# Altium PCB SamirAbiNahed-DigitalTasbeeh.PcbDoc (part 1 of 2)
Units mm, origin at the board's own origin, x right, y up, seen from the top; angles counter-clockwise.
Board outline 32 x 12.5 mm, 2 copper layers (Top Layer, Bottom Layer), stack 0.37 mm thick; 38 components, 34 nets, 117 pads, 35 vias.
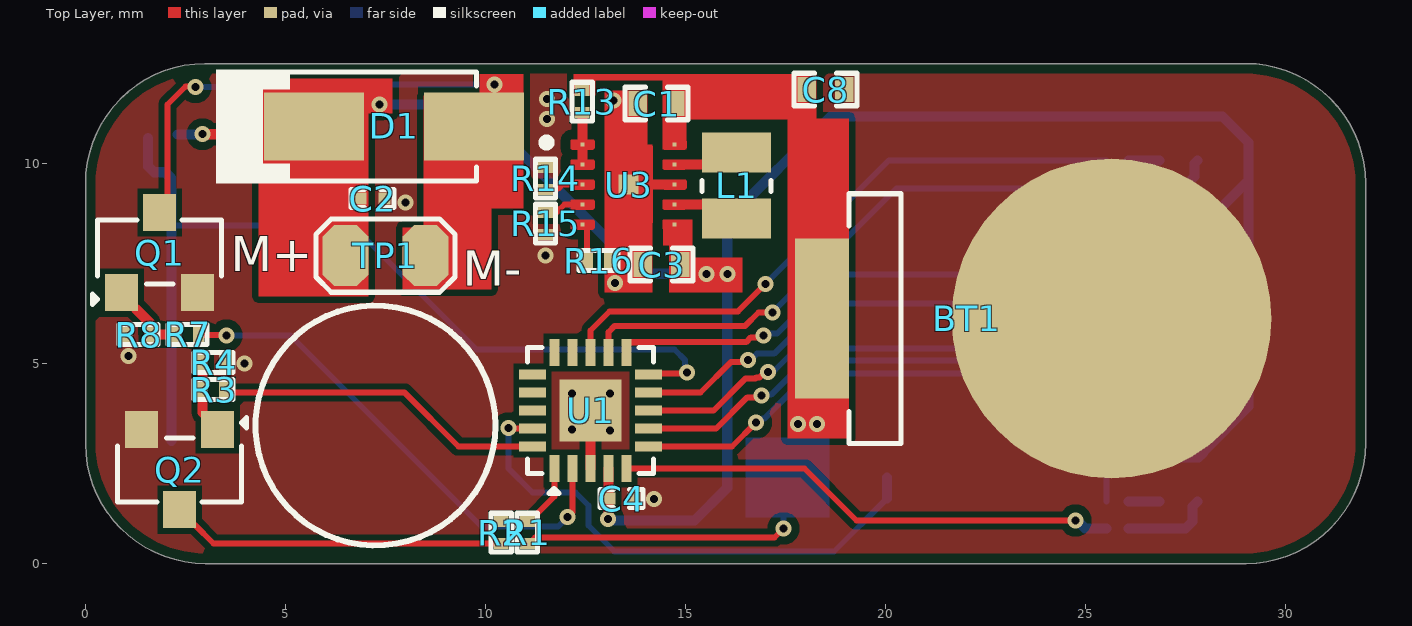
[diagram p0: Top Layer view]
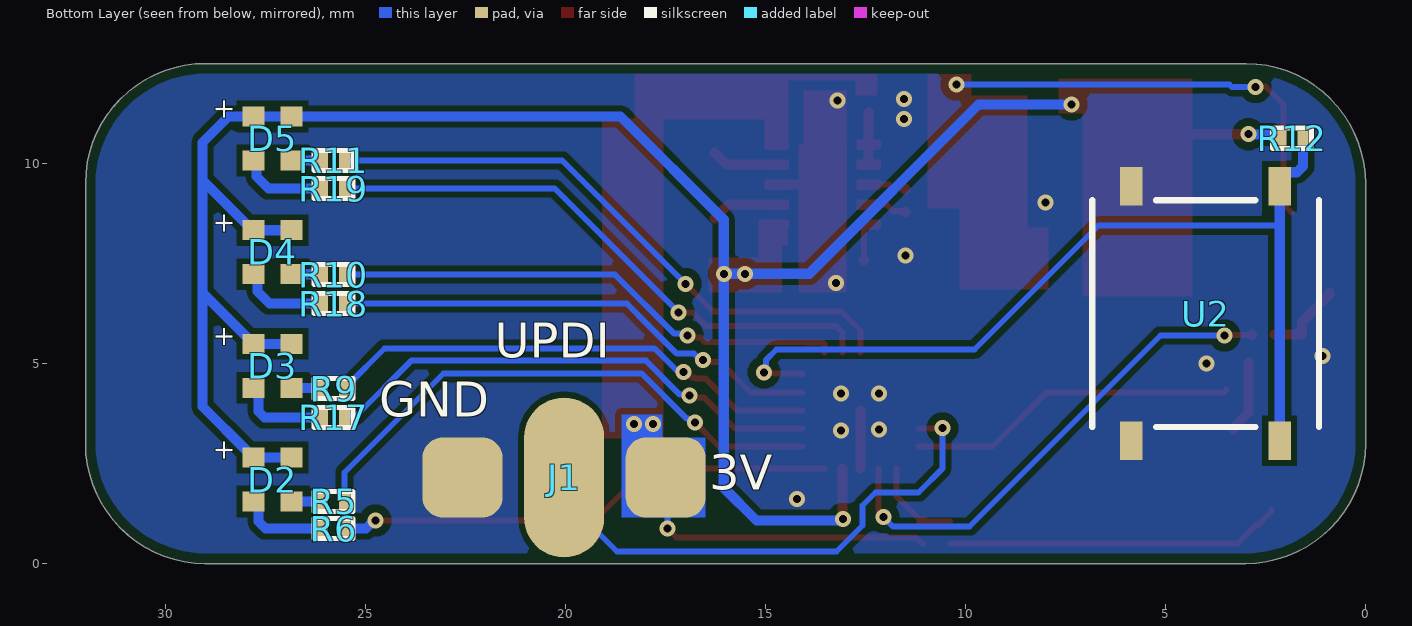
[diagram p1: Bottom Layer view, seen from below]
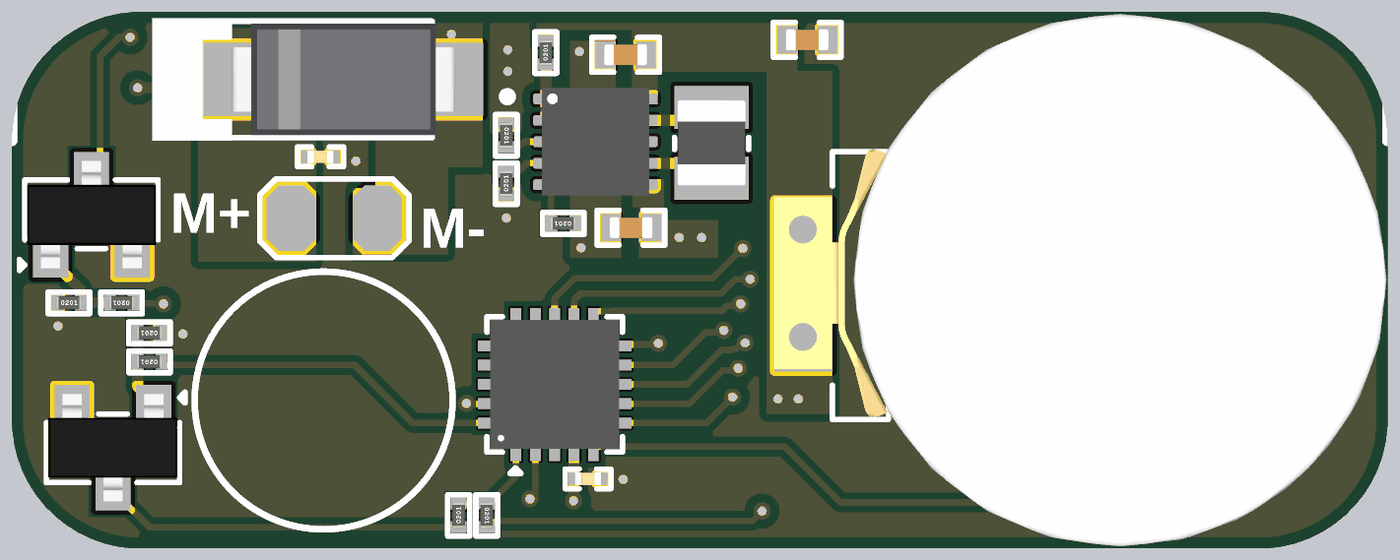
[diagram p2: 3D render of the assembled board from above, using the file's embedded part models]
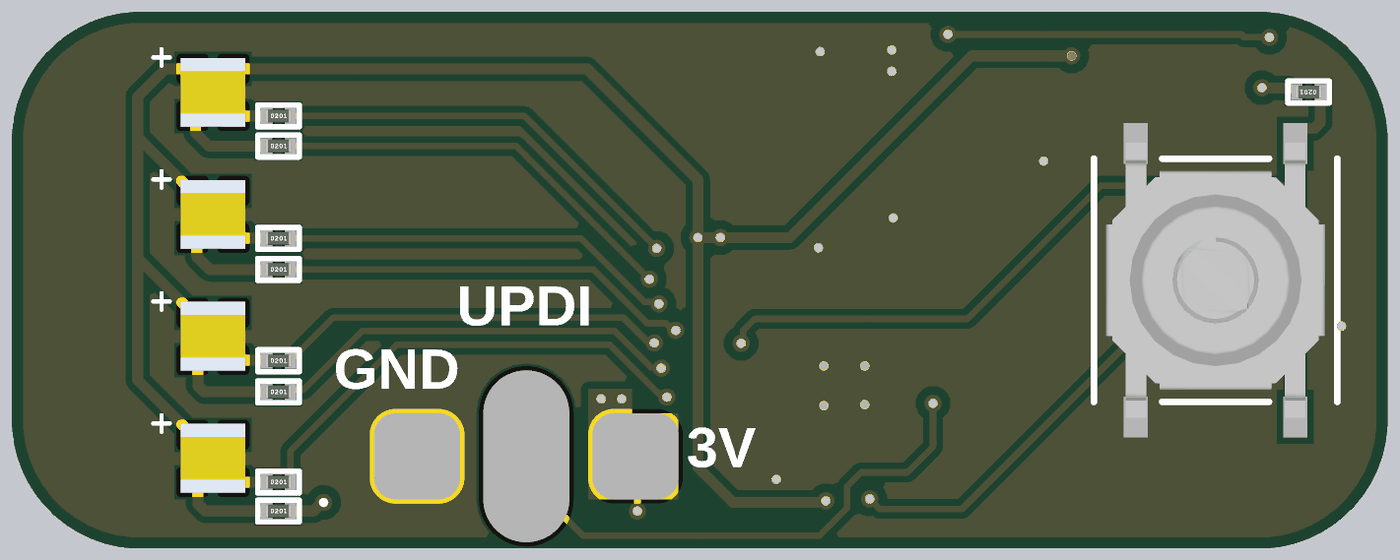
[diagram p3: 3D render of the assembled board from below, using the file's embedded part models]

## Layer stack, top to bottom
Top Solder: solder mask 0.01, Solder Resist, Dk 3.5
Top Layer: signal copper 0.035
Dielectric 1: dielectric 0.3, FR-4, Dk 4.8
Bottom Layer: signal copper 0.035
Bottom Solder: solder mask 0.01, Solder Resist, Dk 3.5

## Board outline
0,2.987 0,9.5 cw(c3,9.5) 2.987,12.5 29,12.5 cw(c29,9.5) 32,9.513 32,3 cw(c29,3) 29.013,0 3,0 cw(c3,3)

## Design rules (kind name [scope] priority, off if disabled: settings)
BoardOutlineClearance [All] p1: gap=0 ignorepadtopadclearanceinfootprint=FALSE except(0.254: Fill-OutlineEdge Poly-OutlineEdge)
Clearance [All] p1: gap=0.254 ignorepadtopadclearanceinfootprint=FALSE except(0: Arc-Hole Track-Hole SMDPad-Hole THPad-Hole Via-Hole Fill-Hole Poly-Hole Region-Hole Text-Hole; 0.127: Arc-SMDPad Arc-Text Track-SMDPad SMDPad-SMDPad SMDPad-Fill Fill-Fill Text-Text; 0.152: Arc-Arc Arc-Track Arc-Poly Track-Track Track-Poly SMDPad-Poly Fill-Poly Poly-Poly; 0.178: Arc-Via Arc-Region Track-Via Track-Fill Track-Region SMDPad-Via SMDPad-Region THPad-Via THPad-Poly Via-Via Via-Fill Fill-Region Region-Region; 0.203: Via-Poly)
MinimumSolderMaskSliver [All] p1: minsoldermaskwidth=0.025
PlaneConnect [All] p1: planeconnectstyle=Direct reliefexpansion=0.508 reliefentries=4 reliefconductorwidth=0.254 reliefairgap=0.254
PolygonConnect [All] p1: connectstyle=Direct reliefconductorwidth=0.254 reliefentries=4 polygonreliefangle="90 Angle" airgapwidth=0.254
RoutingVias [All] p1: holewidth=0.2 width=0.4 viastyle="Through Hole" minholewidth=0.2 minwidth=0.4 maxholewidth=0.2 maxwidth=0.4
SilkToSilkClearance [All] p1: silktosilkclearance=0
SilkToSolderMaskClearance [IsPad] p1: minsilkscreentomaskgap=0.003 clearancetoexposedcopper=TRUE
SolderMaskExpansion [All] p1: expansion=0.102 istentingtop=FALSE
SupplyNets "Schematic Supply Nets" [InNet('GND')] p1: voltage=0.000
Width [All] p1: maxlimit=0.762 minlimit=0.127 preferedwidth=0.254 minimp=50.000000 maximp=50.000000 favimp=50.000000
26 further rules are at their usual default settings.

## Classes and differential pairs
component class Power: BT1 C1 C3 C8 L1 R13 R14 R15 R16 U3
component class MCU: C2 C4 D1 D2 D3 D4 D5 J1 Q1 Q2 R1 R2 R3 R4 R5 R6 R7 R8 R9 R10 R11 R12 R17 R18 R19 TP1 U1 U2

## Components (designator, comment, footprint, x,y, rotation, side; value= is the part's Value field where it differs from the comment)
BT1 "120TR" BAT_120TR 18.411,6.125 r180 top
C1 "10uF" Cap-0402 14.275,11.5 r0 top
C2 "100nF" Cap-0201 7.177,9.125 r180 top
C3 "10uF" Cap-0402 14.4,7.475 r0 top
C4 "100nF" Cap-0201 13.4,1.625 r0 top
C8 "22uF" Cap-0402 18.5,11.85 r180 top
D1 "SS24A" SMA 7.713,10.926 r0 top
D2 "A-SP1942S1W1D-C01-2T" A-SP1942S1W1D-C01-2T 27.8,1.55 r90 bottom
D3 "A-SP1942S1W1D-C01-2T" A-SP1942S1W1D-C01-2T 27.8,4.392 r90 bottom
D4 "A-SP1942S1W1D-C01-2T" A-SP1942S1W1D-C01-2T 27.8,7.233 r90 bottom
D5 "A-SP1942S1W1D-C01-2T" A-SP1942S1W1D-C01-2T 27.8,10.075 r90 bottom
J1 "Test Pad SMD 3 Pin" "Test Pad (SMD 3 Pin)" 20.035,2.15 r270 bottom
L1 "2.2uH" IND-0806 16.275,9.45 r270 top
Q1 "SI2302-TP" SOT-23 1.85,7.775 r0 top
Q2 "SI2302-TP" SOT-23 2.35,2.35 r180 top
R1 "1M" Res-0201 11.046,0.775 r270 top value=1MR
R2 "1M" Res-0201 10.392,0.775 r90 top value=1MR
R3 "100R" Res-0201 3.2,4.35 r180 top
R4 "100K" Res-0201 3.2,5.025 r180 top
R5 "100R" Res-0201 25.8,1.55 r180 bottom
R6 "200R" Res-0201 25.8,0.875 r180 bottom
R7 "100R" Res-0201 2.55,5.725 r180 top
R8 "100K" Res-0201 1.325,5.725 r0 top
R9 "100R" Res-0201 25.8,4.375 r180 bottom
R10 "100R" Res-0201 25.8,7.225 r180 bottom
R11 "100R" Res-0201 25.8,10.075 r180 bottom
R12 "10K" Res-0201 1.837,10.634 r0 bottom
R13 "1M" Res-0201 12.417,11.55 r90 top
R14 "20.5k" Res-0201 11.5,9.625 r270 top
R15 "0R" Res-0201 11.5,8.5 r90 top
R16 "13.3k" Res-0201 12.825,7.575 r180 top
R17 "200R" Res-0201 25.8,3.65 r180 bottom
R18 "200R" Res-0201 25.8,6.5 r180 bottom
R19 "200R" Res-0201 25.8,9.375 r180 bottom
TP1 "LCM0720A3134F" "2 Test Pad" 8.498,7.697 r180 top
U1 "ATTINY1616-MNR" VQFN-20-EP(3x3) 12.625,3.825 r90 top
U2 "GT-TC084A-H015-L5" SMT_FS 4,6.25 r90 bottom
U3 "TPS63900DSKR" IC_TPS63900DSKR 13.575,9.475 r0 top

## Footprints (in the part's own frame and the unit in brackets; to place one, negate y for a bottom-side part, rotate by r counter-clockwise, add the part's x,y. Pads: shape width x height; smd on the part's side, far side on the other; paste and mask are expansions set on the pad)
"2 Test Pad" [mil]
  oct 45x60 smd: 1(0,0) 2(78.74,0)
  silkscreen extent -29,-36 108,36
A-SP1942S1W1D-C01-2T [mm]
  rect 0.5x0.55 smd: 1(0,-0.95) 2(0,0) 3(1.1,0) 4(1.1,-0.95)
  body extent -0.25,-1.22 1.35,0.28, height 0.4
BAT_120TR [mm]
  round 8 smd: N(-7.239,0)
  rect 1.35x4 smd: P(0,0)
  silkscreen extent -1.97,-3.12 -0.67,3.12, body extent -13.57,-6.33 0.69,6.07, height 2.5
Cap-0201 [mm]
  rect 0.3x0.3 smd mask+0.055: 1(-0.3,0) 2(0.3,0)
  silkscreen extent -0.53,-0.23 0.53,0.23, body extent -0.3,-0.15 0.3,0.15, height 0.28
Cap-0402 [mil]
  rect 18x25 smd mask+2.36: 1(-18.5,0) 2(18.5,0)
  silkscreen extent -31,-16 31,16, body extent -20,-10 20,10, height 19
IC_TPS63900DSKR [mm]
  rect 0.1x0.1 smd paste-1 mask+0: 1(-1.15,1) 2(-1.15,0.5) 3(-1.15,0) 4(-1.15,-0.5) 5(-1.15,-1) 6(1.15,-1) 7(1.15,-0.5) 8(1.15,0) 9(1.15,0.5) 10(1.15,1)
  rect 0.5x0.5 smd paste-1 mask+0: 11(0,0)
  Top Layer region: -0.892,0.124 -0.89,0.124 -0.887,0.123 -0.885,0.123 -0.882,0.122 -0.88,0.121 -0.877,0.12 -0.875,0.118 -0.873,0.117 -0.871,0.115 -0.869,0.114 -0.867,0.112 -0.865,0.11 -0.863,0.108 -0.861,0.106 -0.86,0.104 -0.858,0.102 -0.857,0.1 -0.855,0.098 -0.854,0.095 -0.853,0.093 -0.852,0.09 -0.852,0.088 -0.851,0.085 -0.851,0.083 -0.85,0.08 -0.85,0.078 -0.85,0.075 -0.85,-0.075 -0.85,-0.078 -0.85,-0.08 -0.851,-0.083 -0.851,-0.085 -0.852,-0.088 -0.852,-0.09 -0.853,-0.093 -0.854,-0.095 -0.855,-0.098 -0.857,-0.1 -0.858,-0.102 -0.86,-0.104 -0.861,-0.106 -0.863,-0.108 -0.865,-0.11 -0.867,-0.112 -0.869,-0.114 -0.871,-0.115 -0.873,-0.117 -0.875,-0.118 -0.877,-0.12 -0.88,-0.121 -0.882,-0.122 -0.885,-0.123 -0.887,-0.123 -0.89,-0.124 -0.892,-0.124 -0.895,-0.125 -1.405,-0.125 -1.408,-0.124 -1.41,-0.124 -1.413,-0.123 -1.415,-0.123 -1.418,-0.122 -1.42,-0.121 -1.423,-0.12 -1.425,-0.118 -1.427,-0.117 -1.429,-0.115 -1.431,-0.114 -1.433,-0.112 -1.435,-0.11 -1.437,-0.108 -1.439,-0.106 -1.44,-0.104 -1.442,-0.102 -1.443,-0.1 -1.445,-0.098 -1.446,-0.095 -1.447,-0.093 -1.448,-0.09 -1.448,-0.088 -1.449,-0.085 -1.449,-0.083 -1.45,-0.08 -1.45,-0.078 -1.45,-0.075 -1.45,0.075 -1.45,0.078 -1.45,0.08 -1.449,0.083 -1.449,0.085 -1.448,0.088 -1.448,0.09 -1.447,0.093 -1.446,0.095 -1.445,0.098 -1.443,0.1 -1.442,0.102 -1.44,0.104 -1.439,0.106 -1.437,0.108 -1.435,0.11 -1.433,0.112 -1.431,0.114 -1.429,0.115 -1.427,0.117 -1.425,0.118 -1.423,0.12 -1.42,0.121 -1.418,0.122 -1.415,0.123 -1.413,0.123 -1.41,0.124 -1.408,0.124 -1.405,0.125 -0.895,0.125
  Top Layer region: -0.892,0.624 -0.89,0.624 -0.887,0.623 -0.885,0.623 -0.882,0.622 -0.88,0.621 -0.877,0.62 -0.875,0.618 -0.873,0.617 -0.871,0.615 -0.869,0.614 -0.867,0.612 -0.865,0.61 -0.863,0.608 -0.861,0.606 -0.86,0.604 -0.858,0.602 -0.857,0.6 -0.855,0.598 -0.854,0.595 -0.853,0.593 -0.852,0.59 -0.852,0.588 -0.851,0.585 -0.851,0.583 -0.85,0.58 -0.85,0.578 -0.85,0.575 -0.85,0.425 -0.85,0.422 -0.85,0.42 -0.851,0.417 -0.851,0.415 -0.852,0.412 -0.852,0.41 -0.853,0.407 -0.854,0.405 -0.855,0.402 -0.857,0.4 -0.858,0.398 -0.86,0.396 -0.861,0.394 -0.863,0.392 -0.865,0.39 -0.867,0.388 -0.869,0.386 -0.871,0.385 -0.873,0.383 -0.875,0.382 -0.877,0.38 -0.88,0.379 -0.882,0.378 -0.885,0.377 -0.887,0.377 -0.89,0.376 -0.892,0.376 -0.895,0.375 -1.405,0.375 -1.408,0.376 -1.41,0.376 -1.413,0.377 -1.415,0.377 -1.418,0.378 -1.42,0.379 -1.423,0.38 -1.425,0.382 -1.427,0.383 -1.429,0.385 -1.431,0.386 -1.433,0.388 -1.435,0.39 -1.437,0.392 -1.439,0.394 -1.44,0.396 -1.442,0.398 -1.443,0.4 -1.445,0.402 -1.446,0.405 -1.447,0.407 -1.448,0.41 -1.448,0.412 -1.449,0.415 -1.449,0.417 -1.45,0.42 -1.45,0.422 -1.45,0.425 -1.45,0.575 -1.45,0.578 -1.45,0.58 -1.449,0.583 -1.449,0.585 -1.448,0.588 -1.448,0.59 -1.447,0.593 -1.446,0.595 -1.445,0.598 -1.443,0.6 -1.442,0.602 -1.44,0.604 -1.439,0.606 -1.437,0.608 -1.435,0.61 -1.433,0.612 -1.431,0.614 -1.429,0.615 -1.427,0.617 -1.425,0.618 -1.423,0.62 -1.42,0.621 -1.418,0.622 -1.415,0.623 -1.413,0.623 -1.41,0.624 -1.408,0.624 -1.405,0.625 -0.895,0.625
  Top Layer region: -0.892,1.124 -0.89,1.124 -0.887,1.123 -0.885,1.123 -0.882,1.122 -0.88,1.121 -0.877,1.12 -0.875,1.118 -0.873,1.117 -0.871,1.115 -0.869,1.114 -0.867,1.112 -0.865,1.11 -0.863,1.108 -0.861,1.106 -0.86,1.104 -0.858,1.102 -0.857,1.1 -0.855,1.098 -0.854,1.095 -0.853,1.093 -0.852,1.09 -0.852,1.088 -0.851,1.085 -0.851,1.083 -0.85,1.08 -0.85,1.078 -0.85,1.075 -0.85,0.925 -0.85,0.922 -0.85,0.92 -0.851,0.917 -0.851,0.915 -0.852,0.912 -0.852,0.91 -0.853,0.907 -0.854,0.905 -0.855,0.902 -0.857,0.9 -0.858,0.898 -0.86,0.896 -0.861,0.894 -0.863,0.892 -0.865,0.89 -0.867,0.888 -0.869,0.886 -0.871,0.885 -0.873,0.883 -0.875,0.882 -0.877,0.88 -0.88,0.879 -0.882,0.878 -0.885,0.877 -0.887,0.877 -0.89,0.876 -0.892,0.876 -0.895,0.875 -1.405,0.875 -1.408,0.876 -1.41,0.876 -1.413,0.877 -1.415,0.877 -1.418,0.878 -1.42,0.879 -1.423,0.88 -1.425,0.882 -1.427,0.883 -1.429,0.885 -1.431,0.886 -1.433,0.888 -1.435,0.89 -1.437,0.892 -1.439,0.894 -1.44,0.896 -1.442,0.898 -1.443,0.9 -1.445,0.902 -1.446,0.905 -1.447,0.907 -1.448,0.91 -1.448,0.912 -1.449,0.915 -1.449,0.917 -1.45,0.92 -1.45,0.922 -1.45,0.925 -1.45,1.075 -1.45,1.078 -1.45,1.08 -1.449,1.083 -1.449,1.085 -1.448,1.088 -1.448,1.09 -1.447,1.093 -1.446,1.095 -1.445,1.098 -1.443,1.1 -1.442,1.102 -1.44,1.104 -1.439,1.106 -1.437,1.108 -1.435,1.11 -1.433,1.112 -1.431,1.114 -1.429,1.115 -1.427,1.117 -1.425,1.118 -1.423,1.12 -1.42,1.121 -1.418,1.122 -1.415,1.123 -1.413,1.123 -1.41,1.124 -1.408,1.124 -1.405,1.125 -0.895,1.125
  Top Layer region: -0.892,-0.376 -0.89,-0.376 -0.887,-0.377 -0.885,-0.377 -0.882,-0.378 -0.88,-0.379 -0.877,-0.38 -0.875,-0.382 -0.873,-0.383 -0.871,-0.385 -0.869,-0.386 -0.867,-0.388 -0.865,-0.39 -0.863,-0.392 -0.861,-0.394 -0.86,-0.396 -0.858,-0.398 -0.857,-0.4 -0.855,-0.402 -0.854,-0.405 -0.853,-0.407 -0.852,-0.41 -0.852,-0.412 -0.851,-0.415 -0.851,-0.417 -0.85,-0.42 -0.85,-0.422 -0.85,-0.425 -0.85,-0.575 -0.85,-0.578 -0.85,-0.58 -0.851,-0.583 -0.851,-0.585 -0.852,-0.588 -0.852,-0.59 -0.853,-0.593 -0.854,-0.595 -0.855,-0.598 -0.857,-0.6 -0.858,-0.602 -0.86,-0.604 -0.861,-0.606 -0.863,-0.608 -0.865,-0.61 -0.867,-0.612 -0.869,-0.614 -0.871,-0.615 -0.873,-0.617 -0.875,-0.618 -0.877,-0.62 -0.88,-0.621 -0.882,-0.622 -0.885,-0.623 -0.887,-0.623 -0.89,-0.624 -0.892,-0.624 -0.895,-0.625 -1.405,-0.625 -1.408,-0.624 -1.41,-0.624 -1.413,-0.623 -1.415,-0.623 -1.418,-0.622 -1.42,-0.621 -1.423,-0.62 -1.425,-0.618 -1.427,-0.617 -1.429,-0.615 -1.431,-0.614 -1.433,-0.612 -1.435,-0.61 -1.437,-0.608 -1.439,-0.606 -1.44,-0.604 -1.442,-0.602 -1.443,-0.6 -1.445,-0.598 -1.446,-0.595 -1.447,-0.593 -1.448,-0.59 -1.448,-0.588 -1.449,-0.585 -1.449,-0.583 -1.45,-0.58 -1.45,-0.578 -1.45,-0.575 -1.45,-0.425 -1.45,-0.422 -1.45,-0.42 -1.449,-0.417 -1.449,-0.415 -1.448,-0.412 -1.448,-0.41 -1.447,-0.407 -1.446,-0.405 -1.445,-0.402 -1.443,-0.4 -1.442,-0.398 -1.44,-0.396 -1.439,-0.394 -1.437,-0.392 -1.435,-0.39 -1.433,-0.388 -1.431,-0.386 -1.429,-0.385 -1.427,-0.383 -1.425,-0.382 -1.423,-0.38 -1.42,-0.379 -1.418,-0.378 -1.415,-0.377 -1.413,-0.377 -1.41,-0.376 -1.408,-0.376 -1.405,-0.375 -0.895,-0.375
  Top Layer region: -0.892,-0.876 -0.89,-0.876 -0.887,-0.877 -0.885,-0.877 -0.882,-0.878 -0.88,-0.879 -0.877,-0.88 -0.875,-0.882 -0.873,-0.883 -0.871,-0.885 -0.869,-0.886 -0.867,-0.888 -0.865,-0.89 -0.863,-0.892 -0.861,-0.894 -0.86,-0.896 -0.858,-0.898 -0.857,-0.9 -0.855,-0.902 -0.854,-0.905 -0.853,-0.907 -0.852,-0.91 -0.852,-0.912 -0.851,-0.915 -0.851,-0.917 -0.85,-0.92 -0.85,-0.922 -0.85,-0.925 -0.85,-1.075 -0.85,-1.078 -0.85,-1.08 -0.851,-1.083 -0.851,-1.085 -0.852,-1.088 -0.852,-1.09 -0.853,-1.093 -0.854,-1.095 -0.855,-1.098 -0.857,-1.1 -0.858,-1.102 -0.86,-1.104 -0.861,-1.106 -0.863,-1.108 -0.865,-1.11 -0.867,-1.112 -0.869,-1.114 -0.871,-1.115 -0.873,-1.117 -0.875,-1.118 -0.877,-1.12 -0.88,-1.121 -0.882,-1.122 -0.885,-1.123 -0.887,-1.123 -0.89,-1.124 -0.892,-1.124 -0.895,-1.125 -1.405,-1.125 -1.408,-1.124 -1.41,-1.124 -1.413,-1.123 -1.415,-1.123 -1.418,-1.122 -1.42,-1.121 -1.423,-1.12 -1.425,-1.118 -1.427,-1.117 -1.429,-1.115 -1.431,-1.114 -1.433,-1.112 -1.435,-1.11 -1.437,-1.108 -1.439,-1.106 -1.44,-1.104 -1.442,-1.102 -1.443,-1.1 -1.445,-1.098 -1.446,-1.095 -1.447,-1.093 -1.448,-1.09 -1.448,-1.088 -1.449,-1.085 -1.449,-1.083 -1.45,-1.08 -1.45,-1.078 -1.45,-1.075 -1.45,-0.925 -1.45,-0.922 -1.45,-0.92 -1.449,-0.917 -1.449,-0.915 -1.448,-0.912 -1.448,-0.91 -1.447,-0.907 -1.446,-0.905 -1.445,-0.902 -1.443,-0.9 -1.442,-0.898 -1.44,-0.896 -1.439,-0.894 -1.437,-0.892 -1.435,-0.89 -1.433,-0.888 -1.431,-0.886 -1.429,-0.885 -1.427,-0.883 -1.425,-0.882 -1.423,-0.88 -1.42,-0.879 -1.418,-0.878 -1.415,-0.877 -1.413,-0.877 -1.41,-0.876 -1.408,-0.876 -1.405,-0.875 -0.895,-0.875
  Top Layer region: 1.408,0.124 1.41,0.124 1.413,0.123 1.415,0.123 1.418,0.122 1.42,0.121 1.423,0.12 1.425,0.118 1.427,0.117 1.429,0.115 1.431,0.114 1.433,0.112 1.435,0.11 1.437,0.108 1.439,0.106 1.44,0.104 1.442,0.102 1.443,0.1 1.445,0.098 1.446,0.095 1.447,0.093 1.448,0.09 1.448,0.088 1.449,0.085 1.449,0.083 1.45,0.08 1.45,0.078 1.45,0.075 1.45,-0.075 1.45,-0.078 1.45,-0.08 1.449,-0.083 1.449,-0.085 1.448,-0.088 1.448,-0.09 1.447,-0.093 1.446,-0.095 1.445,-0.098 1.443,-0.1 1.442,-0.102 1.44,-0.104 1.439,-0.106 1.437,-0.108 1.435,-0.11 1.433,-0.112 1.431,-0.114 1.429,-0.115 1.427,-0.117 1.425,-0.118 1.423,-0.12 1.42,-0.121 1.418,-0.122 1.415,-0.123 1.413,-0.123 1.41,-0.124 1.408,-0.124 1.405,-0.125 0.895,-0.125 0.892,-0.124 0.89,-0.124 0.887,-0.123 0.885,-0.123 0.882,-0.122 0.88,-0.121 0.877,-0.12 0.875,-0.118 0.873,-0.117 0.871,-0.115 0.869,-0.114 0.867,-0.112 0.865,-0.11 0.863,-0.108 0.861,-0.106 0.86,-0.104 0.858,-0.102 0.857,-0.1 0.855,-0.098 0.854,-0.095 0.853,-0.093 0.852,-0.09 0.852,-0.088 0.851,-0.085 0.851,-0.083 0.85,-0.08 0.85,-0.078 0.85,-0.075 0.85,0.075 0.85,0.078 0.85,0.08 0.851,0.083 0.851,0.085 0.852,0.088 0.852,0.09 0.853,0.093 0.854,0.095 0.855,0.098 0.857,0.1 0.858,0.102 0.86,0.104 0.861,0.106 0.863,0.108 0.865,0.11 0.867,0.112 0.869,0.114 0.871,0.115 0.873,0.117 0.875,0.118 0.877,0.12 0.88,0.121 0.882,0.122 0.885,0.123 0.887,0.123 0.89,0.124 0.892,0.124 0.895,0.125 1.405,0.125
  Top Layer region: 1.408,0.624 1.41,0.624 1.413,0.623 1.415,0.623 1.418,0.622 1.42,0.621 1.423,0.62 1.425,0.618 1.427,0.617 1.429,0.615 1.431,0.614 1.433,0.612 1.435,0.61 1.437,0.608 1.439,0.606 1.44,0.604 1.442,0.602 1.443,0.6 1.445,0.598 1.446,0.595 1.447,0.593 1.448,0.59 1.448,0.588 1.449,0.585 1.449,0.583 1.45,0.58 1.45,0.578 1.45,0.575 1.45,0.425 1.45,0.422 1.45,0.42 1.449,0.417 1.449,0.415 1.448,0.412 1.448,0.41 1.447,0.407 1.446,0.405 1.445,0.402 1.443,0.4 1.442,0.398 1.44,0.396 1.439,0.394 1.437,0.392 1.435,0.39 1.433,0.388 1.431,0.386 1.429,0.385 1.427,0.383 1.425,0.382 1.423,0.38 1.42,0.379 1.418,0.378 1.415,0.377 1.413,0.377 1.41,0.376 1.408,0.376 1.405,0.375 0.895,0.375 0.892,0.376 0.89,0.376 0.887,0.377 0.885,0.377 0.882,0.378 0.88,0.379 0.877,0.38 0.875,0.382 0.873,0.383 0.871,0.385 0.869,0.386 0.867,0.388 0.865,0.39 0.863,0.392 0.861,0.394 0.86,0.396 0.858,0.398 0.857,0.4 0.855,0.402 0.854,0.405 0.853,0.407 0.852,0.41 0.852,0.412 0.851,0.415 0.851,0.417 0.85,0.42 0.85,0.422 0.85,0.425 0.85,0.575 0.85,0.578 0.85,0.58 0.851,0.583 0.851,0.585 0.852,0.588 0.852,0.59 0.853,0.593 0.854,0.595 0.855,0.598 0.857,0.6 0.858,0.602 0.86,0.604 0.861,0.606 0.863,0.608 0.865,0.61 0.867,0.612 0.869,0.614 0.871,0.615 0.873,0.617 0.875,0.618 0.877,0.62 0.88,0.621 0.882,0.622 0.885,0.623 0.887,0.623 0.89,0.624 0.892,0.624 0.895,0.625 1.405,0.625
  Top Layer region: 1.408,1.124 1.41,1.124 1.413,1.123 1.415,1.123 1.418,1.122 1.42,1.121 1.423,1.12 1.425,1.118 1.427,1.117 1.429,1.115 1.431,1.114 1.433,1.112 1.435,1.11 1.437,1.108 1.439,1.106 1.44,1.104 1.442,1.102 1.443,1.1 1.445,1.098 1.446,1.095 1.447,1.093 1.448,1.09 1.448,1.088 1.449,1.085 1.449,1.083 1.45,1.08 1.45,1.078 1.45,1.075 1.45,0.925 1.45,0.922 1.45,0.92 1.449,0.917 1.449,0.915 1.448,0.912 1.448,0.91 1.447,0.907 1.446,0.905 1.445,0.902 1.443,0.9 1.442,0.898 1.44,0.896 1.439,0.894 1.437,0.892 1.435,0.89 1.433,0.888 1.431,0.886 1.429,0.885 1.427,0.883 1.425,0.882 1.423,0.88 1.42,0.879 1.418,0.878 1.415,0.877 1.413,0.877 1.41,0.876 1.408,0.876 1.405,0.875 0.895,0.875 0.892,0.876 0.89,0.876 0.887,0.877 0.885,0.877 0.882,0.878 0.88,0.879 0.877,0.88 0.875,0.882 0.873,0.883 0.871,0.885 0.869,0.886 0.867,0.888 0.865,0.89 0.863,0.892 0.861,0.894 0.86,0.896 0.858,0.898 0.857,0.9 0.855,0.902 0.854,0.905 0.853,0.907 0.852,0.91 0.852,0.912 0.851,0.915 0.851,0.917 0.85,0.92 0.85,0.922 0.85,0.925 0.85,1.075 0.85,1.078 0.85,1.08 0.851,1.083 0.851,1.085 0.852,1.088 0.852,1.09 0.853,1.093 0.854,1.095 0.855,1.098 0.857,1.1 0.858,1.102 0.86,1.104 0.861,1.106 0.863,1.108 0.865,1.11 0.867,1.112 0.869,1.114 0.871,1.115 0.873,1.117 0.875,1.118 0.877,1.12 0.88,1.121 0.882,1.122 0.885,1.123 0.887,1.123 0.89,1.124 0.892,1.124 0.895,1.125 1.405,1.125
  Top Layer region: 1.408,-0.376 1.41,-0.376 1.413,-0.377 1.415,-0.377 1.418,-0.378 1.42,-0.379 1.423,-0.38 1.425,-0.382 1.427,-0.383 1.429,-0.385 1.431,-0.386 1.433,-0.388 1.435,-0.39 1.437,-0.392 1.439,-0.394 1.44,-0.396 1.442,-0.398 1.443,-0.4 1.445,-0.402 1.446,-0.405 1.447,-0.407 1.448,-0.41 1.448,-0.412 1.449,-0.415 1.449,-0.417 1.45,-0.42 1.45,-0.422 1.45,-0.425 1.45,-0.575 1.45,-0.578 1.45,-0.58 1.449,-0.583 1.449,-0.585 1.448,-0.588 1.448,-0.59 1.447,-0.593 1.446,-0.595 1.445,-0.598 1.443,-0.6 1.442,-0.602 1.44,-0.604 1.439,-0.606 1.437,-0.608 1.435,-0.61 1.433,-0.612 1.431,-0.614 1.429,-0.615 1.427,-0.617 1.425,-0.618 1.423,-0.62 1.42,-0.621 1.418,-0.622 1.415,-0.623 1.413,-0.623 1.41,-0.624 1.408,-0.624 1.405,-0.625 0.895,-0.625 0.892,-0.624 0.89,-0.624 0.887,-0.623 0.885,-0.623 0.882,-0.622 0.88,-0.621 0.877,-0.62 0.875,-0.618 0.873,-0.617 0.871,-0.615 0.869,-0.614 0.867,-0.612 0.865,-0.61 0.863,-0.608 0.861,-0.606 0.86,-0.604 0.858,-0.602 0.857,-0.6 0.855,-0.598 0.854,-0.595 0.853,-0.593 0.852,-0.59 0.852,-0.588 0.851,-0.585 0.851,-0.583 0.85,-0.58 0.85,-0.578 0.85,-0.575 0.85,-0.425 0.85,-0.422 0.85,-0.42 0.851,-0.417 0.851,-0.415 0.852,-0.412 0.852,-0.41 0.853,-0.407 0.854,-0.405 0.855,-0.402 0.857,-0.4 0.858,-0.398 0.86,-0.396 0.861,-0.394 0.863,-0.392 0.865,-0.39 0.867,-0.388 0.869,-0.386 0.871,-0.385 0.873,-0.383 0.875,-0.382 0.877,-0.38 0.88,-0.379 0.882,-0.378 0.885,-0.377 0.887,-0.377 0.89,-0.376 0.892,-0.376 0.895,-0.375 1.405,-0.375
  Top Layer region: 1.408,-0.876 1.41,-0.876 1.413,-0.877 1.415,-0.877 1.418,-0.878 1.42,-0.879 1.423,-0.88 1.425,-0.882 1.427,-0.883 1.429,-0.885 1.431,-0.886 1.433,-0.888 1.435,-0.89 1.437,-0.892 1.439,-0.894 1.44,-0.896 1.442,-0.898 1.443,-0.9 1.445,-0.902 1.446,-0.905 1.447,-0.907 1.448,-0.91 1.448,-0.912 1.449,-0.915 1.449,-0.917 1.45,-0.92 1.45,-0.922 1.45,-0.925 1.45,-1.075 1.45,-1.078 1.45,-1.08 1.449,-1.083 1.449,-1.085 1.448,-1.088 1.448,-1.09 1.447,-1.093 1.446,-1.095 1.445,-1.098 1.443,-1.1 1.442,-1.102 1.44,-1.104 1.439,-1.106 1.437,-1.108 1.435,-1.11 1.433,-1.112 1.431,-1.114 1.429,-1.115 1.427,-1.117 1.425,-1.118 1.423,-1.12 1.42,-1.121 1.418,-1.122 1.415,-1.123 1.413,-1.123 1.41,-1.124 1.408,-1.124 1.405,-1.125 0.895,-1.125 0.892,-1.124 0.89,-1.124 0.887,-1.123 0.885,-1.123 0.882,-1.122 0.88,-1.121 0.877,-1.12 0.875,-1.118 0.873,-1.117 0.871,-1.115 0.869,-1.114 0.867,-1.112 0.865,-1.11 0.863,-1.108 0.861,-1.106 0.86,-1.104 0.858,-1.102 0.857,-1.1 0.855,-1.098 0.854,-1.095 0.853,-1.093 0.852,-1.09 0.852,-1.088 0.851,-1.085 0.851,-1.083 0.85,-1.08 0.85,-1.078 0.85,-1.075 0.85,-0.925 0.85,-0.922 0.85,-0.92 0.851,-0.917 0.851,-0.915 0.852,-0.912 0.852,-0.91 0.853,-0.907 0.854,-0.905 0.855,-0.902 0.857,-0.9 0.858,-0.898 0.86,-0.896 0.861,-0.894 0.863,-0.892 0.865,-0.89 0.867,-0.888 0.869,-0.886 0.871,-0.885 0.873,-0.883 0.875,-0.882 0.877,-0.88 0.88,-0.879 0.882,-0.878 0.885,-0.877 0.887,-0.877 0.89,-0.876 0.892,-0.876 0.895,-0.875 1.405,-0.875
  Top Layer region: 0.558,0.999 0.56,0.999 0.563,0.998 0.565,0.998 0.568,0.997 0.57,0.996 0.573,0.995 0.575,0.993 0.577,0.992 0.579,0.99 0.581,0.989 0.583,0.987 0.585,0.985 0.587,0.983 0.589,0.981 0.59,0.979 0.592,0.977 0.593,0.975 0.595,0.973 0.596,0.97 0.597,0.968 0.598,0.965 0.598,0.963 0.599,0.96 0.599,0.958 0.6,0.955 0.6,0.953 0.6,0.95 0.6,-0.95 0.6,-0.953 0.6,-0.955 0.599,-0.958 0.599,-0.96 0.598,-0.963 0.598,-0.965 0.597,-0.968 0.596,-0.97 0.595,-0.973 0.593,-0.975 0.592,-0.977 0.59,-0.979 0.589,-0.981 0.587,-0.983 0.585,-0.985 0.583,-0.987 0.581,-0.989 0.579,-0.99 0.577,-0.992 0.575,-0.993 0.573,-0.995 0.57,-0.996 0.568,-0.997 0.565,-0.998 0.563,-0.998 0.56,-0.999 0.558,-0.999 0.555,-1 -0.555,-1 -0.558,-0.999 -0.56,-0.999 -0.563,-0.998 -0.565,-0.998 -0.568,-0.997 -0.57,-0.996 -0.573,-0.995 -0.575,-0.993 -0.577,-0.992 -0.579,-0.99 -0.581,-0.989 -0.583,-0.987 -0.585,-0.985 -0.587,-0.983 -0.589,-0.981 -0.59,-0.979 -0.592,-0.977 -0.593,-0.975 -0.595,-0.973 -0.596,-0.97 -0.597,-0.968 -0.598,-0.965 -0.598,-0.963 -0.599,-0.96 -0.599,-0.958 -0.6,-0.955 -0.6,-0.953 -0.6,-0.95 -0.6,0.95 -0.6,0.953 -0.6,0.955 -0.599,0.958 -0.599,0.96 -0.598,0.963 -0.598,0.965 -0.597,0.968 -0.596,0.97 -0.595,0.973 -0.593,0.975 -0.592,0.977 -0.59,0.979 -0.589,0.981 -0.587,0.983 -0.585,0.985 -0.583,0.987 -0.581,0.989 -0.579,0.99 -0.577,0.992 -0.575,0.993 -0.573,0.995 -0.57,0.996 -0.568,0.997 -0.565,0.998 -0.563,0.998 -0.56,0.999 -0.558,0.999 -0.555,1 0.555,1
  silkscreen extent -2.15,0.95 -1.95,1.15, body extent -1.25,-1.25 1.25,1.25, height 0.75
IND-0806 [mm]
  rect 1x1.72 smd: 1(-0.825,0) 2(0.825,0)
  silkscreen extent -0.13,-0.86 0.15,0.86, body extent -1,-0.8 1,0.8, height 1.2
Res-0201 [mm]
  rect 0.27x0.37 smd mask+0.055: 1(-0.275,0) 2(0.275,0)
  silkscreen extent -0.48,-0.25 0.48,0.25, body extent -0.3,-0.15 0.3,0.15, height 0.29
SMA [mm]
  rect 2.5x1.7 smd: 1(-2,0) 2(2,0)
  silkscreen extent -4.44,-1.42 2.06,1.42, body extent -2.6,-1.3 2.6,1.3, height 2.4
SMT_FS [mil]
  rect 37.5x22 smd paste+0 mask+0: 1(-125.25,73) 2(125.25,73) 3(-125.25,-73) 4(125.25,-73)
  silkscreen extent -112,-112 112,112, body extent -126,-100 126,100, height 59
SOT-23 [mm] "TRANS NPN 40V 0.6A SOT23"
  rect 0.82x0.92 smd: 1(-0.95,-1) 2(0.95,-1) 3(0,1)
  silkscreen extent -1.68,-1.3 1.55,0.81, body extent -1.5,-1.25 1.5,1.25, height 1.05
"Test Pad (SMD 3 Pin)" [mm]
  rrect50% 2x2 smd: 1(0,2.54) 3(0,-2.54)
  oval 4x2 smd: 2(0,0)
VQFN-20-EP(3x3) [mm]
  rect 0.665x0.252 smd paste+0 mask+0.051: 1(-1.45,0.9) 2(-1.45,0.45) 3(-1.45,0) 4(-1.45,-0.45) 5(-1.45,-0.9) 11(1.45,-0.9) 12(1.45,-0.45) 13(1.45,0) 14(1.45,0.45) 15(1.45,0.9)
  rect 0.252x0.665 smd paste+0 mask+0.051: 6(-0.9,-1.45) 7(-0.45,-1.45) 8(0,-1.45) 9(0.45,-1.45) 10(0.9,-1.45) 16(0.9,1.45) 17(0.45,1.45) 18(0,1.45) 19(-0.45,1.45) 20(-0.9,1.45)
  rect 1.55x1.55 smd paste+0 mask+0.051: 21(0,0)
  silkscreen extent -2.07,-1.58 1.58,1.58, body extent -1.5,-1.5 1.5,1.5, height 0.85

## Part data
BT1: JLCPCB Part Number=C5354946, Manufacturer=Keystone, Availability=Unavailable, Manufacturer Part Number=120TR, MP=120TR, Supplier=JLCPCB
C1 C3: library part CL05A106MP5NUNC, "CAP CER 10UF 10V X5R 0402", Case Code (Imperial)=0402, Case Code (Metric)=1005, Dielectric=X5R, LCSC Part Number=C315248, Manufacturer=Samsung, Max Operating Temperature=85°C, Min Operating Temperature=-55°C, Package Quantity=1, Tolerance=20%, Voltage Rating=10V, Capacitance=10uF, Case/Package=0402, Category="Ceramic Capacitors", ComponentLink1Description=https://datasheet.ciiva.com/25721/cl05a106mp5nunc-25721584.pdf?src-supplier=Digi-Key, ComponentLink1URL=https://datasheet.ciiva.com/25721/cl05a106mp5nunc-25721584.pdf?src-supplier=Digi-Key, ComponentLink2Description=https://datasheet.ciiva.com/26838/getdatasheetpartid-745310-26838170.pdf?src-supplier=Verical, ComponentLink2URL=https://datasheet.ciiva.com/26838/getdatasheetpartid-745310-26838170.pdf?src-supplier=Verical, Construction=Flat, Contact Plating=Tin, Depth=0.5mm, Item Type=Capacitor, Lead Free="Lead Free", Length=1mm, Manufacturer Part Number=CL05A106MP5NUNC, Mount="Surface Mount", Packaging="Tape and Reel", Pricing 1="10000=0.02537 (USD)", Radiation Hardening=No, RoHS=Yes, RoHS Compliant=Yes, Series=CL, Stock 1=1729850, Supplier 1=Avnet, Supplier Part Number 1=CL05A106MP5NUNC, Termination=Wraparound, Thickness=0.028inch, Width=0.02inch
C2 C4: library part CC0201KRX5R5BB104, "CAP CER 0.1UF 6.3V X5R 0201", Case Code (Imperial)=0201, Case Code (Metric)=0603, Dielectric=X5R, Manufacturer=Yageo, Max Operating Temperature=85°C, Min Operating Temperature=-55°C, Package Quantity=1, Resistor Type=Ceramic, Tolerance=10%, Voltage Rating=6.3V, Capacitance=100nF, Case/Package=0201, Category="Ceramic Capacitors", ComponentLink1Description=https://datasheet.ciiva.com/7656/1525783-7656597.pdf?src-supplier=Element14, ComponentLink1URL=https://datasheet.ciiva.com/7656/1525783-7656597.pdf?src-supplier=Element14, ComponentLink2Description=https://datasheet.ciiva.com/28450/1359354-28450200.pdf?src-supplier=Element14, ComponentLink2URL=https://datasheet.ciiva.com/28450/1359354-28450200.pdf?src-supplier=Element14, ComponentLink3Description=https://datasheet.ciiva.com/176/mlccorderingcode-176766.pdf?src-supplier=Digi-Key, ComponentLink3URL=https://datasheet.ciiva.com/176/mlccorderingcode-176766.pdf?src-supplier=Digi-Key, ComponentLink4Description=https://datasheet.ciiva.com/176/mlccorderingcode-176765.pdf?src-supplier=Digi-Key, ComponentLink4URL=https://datasheet.ciiva.com/176/mlccorderingcode-176765.pdf?src-supplier=Digi-Key, ComponentLink5Description=https://datasheet.ciiva.com/176/mlccorderingcode-176767.pdf?src-supplier=Digi-Key, ComponentLink5URL=https://datasheet.ciiva.com/176/mlccorderingcode-176767.pdf?src-supplier=Digi-Key, Depth=0.3mm, Halogen Free="Halogen Free", Height=0.3mm, Lead Free="Lead Free", Length=0.6mm, Manufacturer Part Number=CC0201KRX5R5BB104, Mount="Surface Mount", Number of Pins=2, Packaging="Tape and Reel", Pricing 1="15000=0.00238 (USD)", Reach SVHC Compliant=Yes, RoHS=Yes, RoHS Compliant=Yes, Series=CC, Stock 1=1290000, Supplier 1=Avnet, Supplier Part Number 1=CC0201KRX5R5BB104, Termination=SMD/SMT, Thickness=0.013inch, Voltage Rating (DC)=6.3V, Width=0.012inch
C8: library part GRM158R61A226ME15D, "CAP CER 22UF 10V X5R 0402", Case/Package=343Case, Dielectric=1537DielectricType, LCSC Part Number=C3845593, Manufacturer=Murata, Max Operating Temperature=85°C, Min Operating Temperature=-55°C, Supplier Part Number=81-GRM158R61A226ME5D, Tolerance=20%, Voltage Rating=10V, Category="Ceramic Capacitors", Height=800um, Item Type=Capacitor, Length=1mm, Manufacturer Part Number=GRM158R61A226ME15D, Material=4241ConductorMaterial, Pricing="1=0.46, 10=0.225, 50=0.225, 100=0.146, 1000=0.124, 10000=0.106 (USD)", RoHS=Yes, Stock=328944, Supplier=Mouser, Thickness=800um, Voltage Rating (DC)=10V, Width=500um
D1: "40V 500mV@2A 2A SMA(DO-214AC) Schottky Barrier Diodes (SBD) ROHS", LCSC Part Number=C2886579, Manufacturer="Guangdong Hottech", Package=SMA(DO-214AC), ComponentLink1Description=LCSC, ComponentLink1URL=https://www.lcsc.com/product-detail/Schottky-Barrier-Diodes-SBD_Guangdong-Hottech-SS24A_C2886579.html, Manufacturer Part Number=SS24A
D2 D3 D4 D5: "Orange, White 607nm LED Indication - Discrete 1.6V~2.3V 2.4V~3V SMD-4P,1.6x1.5mm", Manufacturer=Amicc, Supplier Part Number=C19171248, Manufacturer Part Number=A-SP1942S1W1D-C01-2T, Supplier=LCSC
J1: "Test Pad"
L1: library part DFE201612E-2R2M=P2, "FIXED IND 2.2UH 1.8A 116MOHM SMD", Current Rating=1.8A, Inductance Tolerance=20%, LCSC Part Number=C337893, Manufacturer=Murata, Manufacturer Part Number=DFE201612E-2R2M=P2, Max Operating Temperature=125°C, Min Operating Temperature=-40°C, Saturation Current=2.4A, Test Frequency=1MHz, ComponentLink1Description=http://www.farnell.com/datasheets/2339714.pdf?src-supplier=Farnell, ComponentLink1URL=http://www.farnell.com/datasheets/2339714.pdf?src-supplier=Farnell, ComponentLink2Description=https://search.murata.co.jp/Ceramy/image/img/P02/J(E)TE243A-0006.pdf?src-supplier=Digikey, ComponentLink2URL=https://search.murata.co.jp/Ceramy/image/img/P02/J(E)TE243A-0006.pdf?src-supplier=Digikey, ComponentLink3Description=http://www.farnell.com/datasheets/2339714.pdf?src-supplier=Newark, ComponentLink3URL=http://www.farnell.com/datasheets/2339714.pdf?src-supplier=Newark, ComponentLink4Description=https://datasheet.octopart.com/DFE201612E-2R2M%3DP2-Murata-datasheet-150582460.pdf?src-supplier=Arrow.cn, ComponentLink4URL=https://datasheet.octopart.com/DFE201612E-2R2M%3DP2-Murata-datasheet-150582460.pdf?src-supplier=Arrow.cn, ESR=116mR, Height=1.2mm, Item Type=Inductors, Packaging=13Packaging, Pricing="1=0.31, 10=0.202, 50=0.202, 100=0.158, 1000=0.145, 10000=0.104 (USD)", RMS Current (Irms)=1.8A, RoHS=Yes, Stock=140327, Supplier=Mouser
Q1 Q2: "SI2302 Series 20 3 A N-Ch Enhancement Mode Field Effect Transistor - SOT-23-3", Case/Package=SOT-23, Continuous Drain Current (ID)=3A, Drain to Source Breakdown Voltage=20V, Drain to Source Resistance=110mR, Gate to Source Voltage (Vgs)=8V, Input Capacitance=237pF, LCSC Part Number=C77977, Manufacturer=MCC, Max Operating Temperature=150°C, Max Power Dissipation=1.25W, Min Operating Temperature=-55°C, Package Quantity=3000, Supplier Part Number 1=SI2302-TPMSCT-ND, Category=Transistors, ComponentLink1Description=https://datasheet.ciiva.com/935/si2302sot-23-935107.pdf?src-supplier=Digi-Key, ComponentLink1URL=https://datasheet.ciiva.com/935/si2302sot-23-935107.pdf?src-supplier=Digi-Key, ComponentLink2Description=https://datasheet.ciiva.com/935/si2302sot-23-935109.pdf?src-supplier=Digi-Key, ComponentLink2URL=https://datasheet.ciiva.com/935/si2302sot-23-935109.pdf?src-supplier=Digi-Key, ComponentLink3Description=https://datasheet.ciiva.com/935/si2302sot-23-935108.pdf?src-supplier=Digi-Key, ComponentLink3URL=https://datasheet.ciiva.com/935/si2302sot-23-935108.pdf?src-supplier=Digi-Key, Drain to Source Voltage (Vdss)=20V, Lead Free="Lead Free", Manufacturer Part Number=SI2302-TP, Mount="Surface Mount", Number of Elements=1, Number of Pins=3, Packaging="Tape and Reel", Polarity=N-CHANNEL, Power Dissipation=1.25W, Pricing 1="1=0.50000, 10=0.40300, 100=0.27460, 500=0.20592, 1000=0.15444 (USD)", Rds On Max=72mR, RoHS=Yes, RoHS Compliant=Yes, Stock 1=13753, Supplier 1=Digi-Key
R1 R2: library part RC0201FR-071ML, "RES 1M OHM 1% 1/20W 0201", Case Code (Imperial)=0201, Case Code (Metric)=0603, LCSC Part Number=C295786, Manufacturer=Yageo, Max Operating Temperature=125°C, Max Power Dissipation=50mW, Min Operating Temperature=-55°C, Package Quantity=10000, Resistance Tolerance=1%, Resistor Type="Thick Film", Temperature Coefficient=200ppm/°C, Voltage Rating=25V, Case/Package=0201, ComponentLink1Description=https://datasheet.ciiva.com/29721/pyu-r-int-thick-7-29721005.pdf?src-supplier=Digikey, ComponentLink1URL=https://datasheet.ciiva.com/29721/pyu-r-int-thick-7-29721005.pdf?src-supplier=Digikey, ComponentLink2Description=https://datasheet.ciiva.com/29721/pyu-r-int-thick-7-29721006.pdf?src-supplier=Digikey, ComponentLink2URL=https://datasheet.ciiva.com/29721/pyu-r-int-thick-7-29721006.pdf?src-supplier=Digikey, ComponentLink3Description=https://datasheet.ciiva.com/7672/1563626-7672207.pdf?src-supplier=Element14, ComponentLink3URL=https://datasheet.ciiva.com/7672/1563626-7672207.pdf?src-supplier=Element14, ComponentLink4Description=https://datasheet.ciiva.com/22698/1563626-22698507.pdf?src-supplier=Element14, ComponentLink4URL=https://datasheet.ciiva.com/22698/1563626-22698507.pdf?src-supplier=Element14, ComponentLink5Description=https://datasheet.ciiva.com/25647/pyu-r-int-thick-7-25647311.pdf?src-supplier=Digikey, ComponentLink5URL=https://datasheet.ciiva.com/25647/pyu-r-int-thick-7-25647311.pdf?src-supplier=Digikey, Construction=Rectangular, Contact Plating=Tin,Matte, Depth=0.3mm, Features="Moisture Resistant", Height=0.01inch, Item Type=Resistor, Lead Free=5697LeadFree, Length=0.6mm, Manufacturer Part Number=RC0201FR-071ML, Military Standard=Not, Number of Terminations=2, Packaging="Tape and Reel", Power Rating=50mW, Pricing="1=0.104, 25=0.016, 100=0.008, 250=0.007, 1000=0.006 (USD)", Reach SVHC Compliant=Unknown, RoHS=Yes, RoHS Compliant=Yes, Series=RC, Stock=13025, Supplier=Avnet, Termination=SMD/SMT, Tolerance=1%, Voltage Rating (DC)=25V, Width=0.3mm
R3 R5 R7 R9 R10 R11: library part RC0201FR-07100RL, "RES 100 OHM Thick Film 0201 1% 1/20W ±200ppm/°C Molded SMD SMD Paper T/R", Case Code (Metric)=0603, Case/Package=0201, LCSC Part Number=C77623, Manufacturer=Yageo, Max Operating Temperature=125°C, Max Power Dissipation=50mW, Min Operating Temperature=-55°C, Package Quantity=1, Resistance Tolerance=1%, Resistor Type="Thick Film", Supplier Part Number=311-100MCT-ND, Temperature Coefficient=200ppm/°C, Voltage Rating=25V, Category="Chip SMD Resistors", ComponentLink1Description=https://datasheet.ciiva.com/2560/pyu-r-int-thick-7-2560866.pdf?src-supplier=Digi-Key, ComponentLink1URL=https://datasheet.ciiva.com/2560/pyu-r-int-thick-7-2560866.pdf?src-supplier=Digi-Key, ComponentLink2Description=https://datasheet.ciiva.com/2560/pyu-r-int-thick-7-2560867.pdf?src-supplier=Digi-Key, ComponentLink2URL=https://datasheet.ciiva.com/2560/pyu-r-int-thick-7-2560867.pdf?src-supplier=Digi-Key, ComponentLink3Description=https://datasheet.ciiva.com/2560/pyu-r-int-thick-7-2560865.pdf?src-supplier=Digi-Key, ComponentLink3URL=https://datasheet.ciiva.com/2560/pyu-r-int-thick-7-2560865.pdf?src-supplier=Digi-Key, ComponentLink4Description=https://datasheet.ciiva.com/8887/pyu-rc0201-51-rohs-l-8-8887865.pdf?src-supplier=Avnet, ComponentLink4URL=https://datasheet.ciiva.com/8887/pyu-rc0201-51-rohs-l-8-8887865.pdf?src-supplier=Avnet, ComponentLink5Description=LCSC, ComponentLink5URL=https://www.lcsc.com/product-detail/Chip-Resistor-Surface-Mount_YAGEO-RC0201FR-07100RL_C77623.html, Contact Plating=Tin,Matte, Features="Moisture Resistant", Height=0.01inch, Item Type=Resistor, Lead Free="Lead Free", Length=0.024inch, Manufacturer Part Number=RC0201FR-07100RL, Number of Terminations=2, Package=0201, Packaging="Cut Tape", Power Rating=50mW, Pricing="1=0.1, 10=0.027, 50=0.0172, 100=0.0143, 500=0.00988, 1000=0.00854, 5000=0.00629 (USD)", Reach SVHC Compliant=Unknown, RoHS=Yes, RoHS Compliant=Yes, Series=RC, Stock=193246, Supplier=Digi-Key, Termination=SMD/SMT, Tolerance=1%, Width=0.012inch
R4 R8: library part RC0201FR-07100KL, "RES 100K OHM 1% 1/20W 0201", Case Code (Imperial)=0201, Case Code (Metric)=0603, LCSC Part Number=C106224, Manufacturer=Yageo, Max Operating Temperature=125°C, Max Power Dissipation=50mW, Min Operating Temperature=-55°C, Package Quantity=10000, Resistance=100kR, Resistance Tolerance=1%, Resistor Type="Thick Film", Supplier Part Number 1=311-100KMCT-ND, Temperature Coefficient=200ppm/°C, Voltage Rating=25V, Case/Package=0201, Category="Chip SMD Resistors", ComponentLink1Description=https://datasheet.ciiva.com/7660/1421516-7660806.pdf?src-supplier=Element14, ComponentLink1URL=https://datasheet.ciiva.com/7660/1421516-7660806.pdf?src-supplier=Element14, ComponentLink2Description=https://datasheet.ciiva.com/22698/1563626-22698495.pdf?src-supplier=Element14, ComponentLink2URL=https://datasheet.ciiva.com/22698/1563626-22698495.pdf?src-supplier=Element14, ComponentLink3Description=https://datasheet.ciiva.com/46391/1421516-46391338.pdf?src-supplier=Element14, ComponentLink3URL=https://datasheet.ciiva.com/46391/1421516-46391338.pdf?src-supplier=Element14, ComponentLink4Description=https://datasheet.ciiva.com/2493/pyu-r-int-thick-7-2493770.pdf?src-supplier=Digi-Key, ComponentLink4URL=https://datasheet.ciiva.com/2493/pyu-r-int-thick-7-2493770.pdf?src-supplier=Digi-Key, ComponentLink5Description=https://datasheet.ciiva.com/2493/pyu-r-int-thick-7-2493771.pdf?src-supplier=Digi-Key, ComponentLink5URL=https://datasheet.ciiva.com/2493/pyu-r-int-thick-7-2493771.pdf?src-supplier=Digi-Key, ComponentLink6Description=https://datasheet.ciiva.com/2493/pyu-r-int-thick-7-2493769.pdf?src-supplier=Digi-Key, ComponentLink6URL=https://datasheet.ciiva.com/2493/pyu-r-int-thick-7-2493769.pdf?src-supplier=Digi-Key, ComponentLink7Description=https://datasheet.ciiva.com/26829/getdatasheetpartid-420441-26829850.pdf?src-supplier=Verical, ComponentLink7URL=https://datasheet.ciiva.com/26829/getdatasheetpartid-420441-26829850.pdf?src-supplier=Verical, Construction=Rectangular, Contact Plating=Tin,Matte, Depth=0.3mm, Features="Moisture Resistant", Height=0.01inch, Item Type=Resistor, Lead Free="Lead Free", Length=0.024inch, Manufacturer Part Number=RC0201FR-07100KL, Military Standard=Not, Number of Pins=2, Number of Terminations=2, Packaging="Tape and Reel", Power Rating=50mW, Pricing 1="1=0.10000, 10=0.03900, 100=0.01570, 1000=0.00705, 2500=0.00612, 5000=0.00506 (USD)", REACH SVHC="No SVHC", RoHS=Yes, RoHS Compliant=Yes, Series=RC, Size Code=0201, Stock 1=6740592, Supplier 1=Digi-Key, Termination=SMD/SMT, Tolerance=1%, Voltage Rating (DC)=25V, Width=0.012inch
R6 R17 R18 R19: library part RC0201FR-07200RL, "RES 200 OHM 1% 1/20W 0201", Case Code (Imperial)=0201, Case Code (Metric)=0603, LCSC Part Number=C274337, Manufacturer=Yageo, Max Operating Temperature=125°C, Max Power Dissipation=50mW, Min Operating Temperature=-55°C, Package Quantity=10000, Resistor Type="Thick Film", Temperature Coefficient=200ppm/°C, Tolerance=1%, Voltage Rating=25V, Case/Package=0201, Category="Chip SMD Resistors", ComponentLink1Description=http://www.mouser.com/ds/2/447/RC0201-559633.pdf?src-supplier=Mouser, ComponentLink1URL=http://www.mouser.com/ds/2/447/RC0201-559633.pdf?src-supplier=Mouser, ComponentLink2Description=http://www.yageo.com/documents/recent/PYu-RC0201_51_RoHS_L_(8).pdf?src-supplier=Future+Electronics, ComponentLink2URL=http://www.yageo.com/documents/recent/PYu-RC0201_51_RoHS_L_(8).pdf?src-supplier=Future+Electronics, ComponentLink3Description=http://www.yageo.com/documents/recent/PYu-RC_Group_51_RoHS_L_10.pdf?src-supplier=Digi-Key, ComponentLink3URL=http://www.yageo.com/documents/recent/PYu-RC_Group_51_RoHS_L_10.pdf?src-supplier=Digi-Key, ComponentLink4Description=http://www.yageo.com/documents/recent/PYu-RC_Group_51_RoHS_L_9.pdf?src-supplier=Digi-Key, ComponentLink4URL=http://www.yageo.com/documents/recent/PYu-RC_Group_51_RoHS_L_9.pdf?src-supplier=Digi-Key, Construction=Rectangular, Depth=0.3mm, Features="Moisture Resistant", Height=0.01inch, Item Type=Resistor, Lead Free="Lead Free", Length=0.6mm, Manufacturer Part Number=RC0201FR-07200RL, Military Standard=Not, Number of Terminations=2, Packaging="Tape and Reel", Power Rating=50mW, Pricing 1="10000=0.00128 (USD)", Resistance=200R, RoHS=Yes, RoHS Compliant=Yes, Series=RC, Size Code=0201, Stock 1=180000, Supplier 1=Avnet, Supplier Part Number 1=RC0201FR-07200RL, Termination=SMD/SMT, Width=0.3mm
R12: library part RC0201FR-0710KL, "RES SMD 10K OHM 1% 1/20W 0201", LCSC Part Number=C106225, Manufacturer=Yageo, Package=0201, ComponentLink7Description=LCSC, ComponentLink7URL=https://www.lcsc.com/product-detail/Chip-Resistor-Surface-Mount_YAGEO-RC0201FR-0710KL_C106225.html, Item Type=Resistor, Manufacturer Part Number=RC0201FR-0710KL
R13: library part 0201WMD1003TEE, "-55℃~+155℃ 1MΩ 25V 50mW Thick Film Resistor ±200ppm/℃ ±5% 0201 Chip Resistor - Surface Mount ROHS", LCSC Part Number=C144007, Manufacturer=YAGEO, Manufacturer Part Number=AF0201JR-071ML, Package=0201, ComponentLink1Description=LCSC, ComponentLink1URL=https://www.lcsc.com/product-detail/Chip-Resistor-Surface-Mount_UNI-ROYAL-Uniroyal-Elec-0201WMD1003TEE_C778396.html, Item Type=Resistor
R14: library part 0201WMD1003TEE, "20.5kΩ 50mW Thick Film Resistor ±1% ±200ppm/℃ 0201 Chip Resistor - Surface Mount RoHS", LCSC Part Number=C226462, Manufacturer=YAGEO, Manufacturer Part Number=AC0201FR-0720K5L, Package=0201, ComponentLink1Description=LCSC, ComponentLink1URL=https://www.lcsc.com/product-detail/Chip-Resistor-Surface-Mount_UNI-ROYAL-Uniroyal-Elec-0201WMD1003TEE_C778396.html, Item Type=Resistor
R15: library part 0201WMD1003TEE, "-55℃~+125℃ 0Ω 25V 50mW Thick Film Resistor ±1% 0201 Chip Resistor - Surface Mount ROHS", LCSC Part Number=C106227, Manufacturer=YAGEO, Manufacturer Part Number=RC0201FR-070RL, Package=0201, ComponentLink1Description=LCSC, ComponentLink1URL=https://www.lcsc.com/product-detail/Chip-Resistor-Surface-Mount_UNI-ROYAL-Uniroyal-Elec-0201WMD1003TEE_C778396.html, Item Type=Resistor
R16: library part 0201WMD1003TEE, "-55℃~+155℃ 13.3kΩ 25V 50mW Thick Film Resistor ±1% ±200ppm/℃ 0201 Chip Resistor - Surface Mount ROHS", LCSC Part Number=C423749, Manufacturer="UNI-ROYAL(Uniroyal Elec)", Manufacturer Part Number=0201WMF1332TEE, Package=0201, ComponentLink1Description=LCSC, ComponentLink1URL=https://www.lcsc.com/product-detail/Chip-Resistor-Surface-Mount_UNI-ROYAL-Uniroyal-Elec-0201WMD1003TEE_C778396.html, Item Type=Resistor
TP1: library part "2 Test Pad", "Wire Connecting Pad", LCSC Part Number=C2895081, Manufacturer Part Number=LCM0720A3134F
U1: "IC MCU 8BIT 16KB FLASH 20VQFN", LCSC Part Number=C507118, Manufacturer="Microchip Tech", Package=QFN-20-EP(3x3), ComponentLink1Description=LCSC, ComponentLink1URL=https://www.lcsc.com/product-detail/Microcontroller-Units-MCUs-MPUs-SOCs_Microchip-Tech-ATTINY1616-MNR_C507118.html, Item Type=IC, Manufacturer Part Number=ATTINY1616-MNR
U2: library part "PTS526 SK15 SMTR2 LFS", "Description", LCSC Part Number=C778172, Manufacturer=G-Switch, Manufacturer_Part_Number=GT-TC084A-H015-L5, Supplier=LCSC, Type=Type
U3: "1.8-V to 5.5-V, 75-nA IQ buck-boost converter with input current limit and Dynamic Voltage Scaling", LCSC Part Number=C1518762, Manufacturer="Texas Instruments", Package="WSON-10 Texas Instruments", Manufacturer Part Number=TPS63900DSKR, SnapEDA_Link=https://www.snapeda.com/parts/TPS63900DSKR/Texas+Instruments/view-part/?ref=snap

## Via types
v1: diameter 0.4, hole 0.2, Top Layer to Bottom Layer, tented both sides, 35 vias

## Nets (pads, with @x,y where several pads share a name; then routed paths per layer and width w, separated by ;. In a path a pad name is that pad's centre, name@x,y a point inside that pad or via, vN(x,y) a via of type N, cw(c..) or ccw(c..) an arc to the next point about the centre after c; other vN are vias at no path point)
+3V_Out: C2.2 C3.2 C4.1 D1.1 D2.3 D2.4 D3.3 D3.4 D4.3 D4.4 D5.3 D5.4 R12.2 TP1.2 U1.4 U3.6 | length 54.4
  Top Layer w0.254: v1(2.923,10.733) 5.508,10.733 D1.1@5.7,10.925 ; v1(13.067,1.112) 13.075,1.12 U1.4
  Bottom Layer w0.254: 2.3,10.725 v1@2.925,10.725 ; v1(7.35,11.475) 9.675,11.475 13.906,7.244 v1(15.519,7.244) v1(16.044,7.244) ; v1@13.084,1.084 13.199,1.084 13.208,1.075 15.225,1.075 16.044,1.894 v1(16.044,7.244) ; D2.4 D2.3 27.825,2.65 27.948,2.773 27.948,2.798 29.075,3.925 29.075,6.767 ; D3.4 D3.3 27.825,5.492 27.948,5.615 27.948,5.64 29.075,6.767 ; D4.4 D4.3 27.825,8.333 29.075,9.583 ; v1(16.044,7.244) 16.044,8.594 18.625,11.175 D5.4 D5.3 28.425,11.175 29.075,10.525 29.075,9.583 ; 29.075,6.767 29.075,9.583
GND: BT1.N C1.1 C2.1 C3.1 C4.2 C8.1 J1.3 Q1.2 Q2.2 R4.1 R8.1 R14.1 R15.1 R16.1 U1.3 U1.21 U2.1 U2.2 U3.8 U3.11 | length 3
  Top Layer w0.254: U1.3 U1.21 ; 13.575,9.125 U3.11 U3.8
  other v1: 14.217,1.612 13.112,3.329 12.162,3.354 12.162,4.254 13.112,4.254 3.975,5 1.073,5.183 13.242,7.007 11.5,7.7 8,9.025 11.535,11.115 13.2,11.575 11.535,11.615
LED1: R19.2 U1.12 | length 14.4
  Top Layer w0.152: U1.12 13.075,5.786 13.228,5.939 16.489,5.939 16.825,6.275 v1(17.172,6.275)
  Bottom Layer w0.152: v1(17.172,6.275) 20.272,9.375 R19.2
LED2: R10.2 U1.11 | length 12.9
  Top Layer w0.152: U1.11 13.525,5.481 13.575,5.531 13.97,5.531 13.975,5.537 16.517,5.537 16.632,5.653 16.903,5.653 v1(16.95,5.7)
  Bottom Layer w0.152: v1(16.95,5.7) 16.997,5.747 17.287,5.747 18.764,7.225 R10.2
NetD1_2: D1.2 Q1.3 TP1.1 | length 11.1
  Top Layer w0.152: Q1.3 2.05,8.975 2.05,11.475 2.5,11.925 v1@2.7,11.925
  Bottom Layer w0.152: v1(2.748,11.908) 3.333,11.908 3.4,11.975 v1(10.225,11.975)
NetD2_1: D2.1 R5.1 | length 0.8
  Bottom Layer w0.254: R5.1 D2.1
NetD2_2: D2.2 R6.1 | length 2.2
  Bottom Layer w0.254: R6.1 27.5,0.875 27.675,1.05 27.675,1.427 D2.2 D2.2
NetD3_1: D3.1 R9.1 | length 0.8
  Bottom Layer w0.254: R9.1 26.075,4.384 26.083,4.392 D3.1
NetD3_2: D3.2 R17.1 | length 2.3
  Bottom Layer w0.254: R17.1 27.525,3.65 27.675,3.8 27.675,4.269 D3.2 D3.2
NetD4_1: D4.1 R10.1 | length 0.8
  Bottom Layer w0.254: R10.1 26.083,7.233 D4.1
NetD4_2: D4.2 R18.1 | length 2.2
  Bottom Layer w0.254: R18.1 27.4,6.5 27.7,6.8 27.7,7.133 D4.2
NetD5_1: D5.1 R11.1 | length 0.8
  Bottom Layer w0.254: R11.1 D5.1
NetD5_2: D5.2 R19.1 | length 2.2
  Bottom Layer w0.254: R19.1 27.425,9.375 27.725,9.675 27.725,10 D5.2
NetJ1_2: J1.2 U1.19 | length 13.3
  Top Layer w0.152: v1@10.575,3.375 U1.19
  Bottom Layer w0.152: v1(10.573,3.383) 10.573,2.377 11.175,1.775 12.25,1.775 12.575,1.45 12.575,0.95 13.225,0.3 18.713,0.3 J1.2@20.035,1.622
  Bottom Layer w0.254: J1.2@20.035,1.622 J1.2
NetL1_1: L1.1 U3.9 | length 1.7
  Top Layer w0.254: U3.9 15.975,9.975 L1.1
NetL1_2: L1.2 U3.7 | length 1.7
  Top Layer w0.254: U3.7 15.925,8.975 L1.2
NetQ1_1: Q1.1 R7.2 R8.2 | length 2
  Top Layer w0.254: Q1.1 0.9,6.725 1.592,6.033 1.592,5.733 R8.2 R7.2
NetQ2_1: Q2.1 R3.2 R4.2 | length 1.8
  Top Layer w0.254: R4.2 R3.2 2.925,3.775 3.3,3.4 Q2.1
NetQ2_3: Q2.3 R2.1 | length 8.4
  Top Layer w0.152: Q2.3 2.35,1.3 2.684,0.966 2.734,0.966 3.2,0.5 R2.1
NetR1_1: R1.1 R2.2 U1.1 | length 2.3
  Top Layer w0.152: R2.2 R1.1 ; R1.1@11.096,1.05 11.725,1.679 U1.1
  Top Layer w0.254: R1.1 R1.1@11.096,1.05
NetR3_1: R3.1 U1.20 | length 8.3
  Top Layer w0.152: R3.1 3.475,4.338 3.534,4.279 5.721,4.279 7.971,4.279 9.325,2.925 U1.20
NetR5_2: R5.2 U1.6 | length 14
  Top Layer w0.152: U1.6 16.163,2.925 v1(16.766,3.528)
  Bottom Layer w0.152: v1(16.766,3.528) 16.833,3.528 16.929,3.624 16.971,3.624 18.097,4.75 23.05,4.75 25.525,2.275 R5.2
NetR6_2: R6.2 U1.5 | length 12.6
  Top Layer w0.152: U1.5 17.975,2.375 19.275,1.075 v1(24.75,1.075)
  Bottom Layer w0.254: v1(24.75,1.075) 24.79,1.075 24.99,0.875 R6.2
NetR7_1: R7.1 U1.2 | length 12.6
  Top Layer w0.152: R7.1@2.833,5.713 v1@3.512,5.713 ; v1@12.05,1.15 12.175,1.275 U1.2
  Top Layer w0.254: R7.1 2.825,5.721 R7.1@2.833,5.713 ; v1@3.512,5.713 v1(3.525,5.7)
  Bottom Layer w0.152: v1(3.525,5.7) 5.125,5.7 9.9,0.925 11.815,0.925 v1(12.048,1.158)
NetR9_2: R9.2 U1.8 | length 12.5
  Top Layer w0.152: U1.8 15.702,3.825 16.506,4.629 16.746,4.629 16.772,4.655 16.854,4.655 16.989,4.79 v1(17.056,4.79)
  Bottom Layer w0.152: v1(17.056,4.79) 17.103,4.838 17.237,4.838 17.774,5.375 24.525,5.375 25.416,4.484 25.466,4.484 25.525,4.425 R9.2
NetR11_2: R11.2 U1.13 | length 15.2
  Top Layer w0.152: U1.13 12.625,5.825 13.1,6.3 16.309,6.3 v1(17,6.991) v1@17,7
  Bottom Layer w0.152: v1(17,6.991) 20.084,10.075 R11.2
NetR12_1: R12.1 U1.10 U2.3 U2.4 | length 23.6
  Top Layer w0.152: U1.10 14.103,4.753 15.008,4.753 v1(15.037,4.781)
  Bottom Layer w0.152: 2.146,8.55 2.246,8.45 6.675,8.45 9.775,5.35 14.725,5.35 14.989,5.086 14.989,4.829 v1(15.037,4.781)
  Bottom Layer w0.254: R12.1 1.562,9.929 1.711,9.781 1.993,9.781 2.146,9.628 U2.4 2.146,8.55 U2.3
NetR13_1: R13.1 U3.1 U3.2 | length 1.3
  Top Layer w0.254: R13.1 12.425,11.267 U3.2
NetR14_2: R14.2 U3.3 | length 0.7
  Top Layer w0.152: R14.2@11.508,9.358 11.524,9.374 11.815,9.374 11.916,9.475 12.109,9.475
  Top Layer w0.254: R14.2 R14.2@11.508,9.358
NetR15_2: R15.2 U3.4 | length 1
  Top Layer w0.152: R15.2@11.508,8.783 11.532,8.807 11.807,8.807 11.975,8.975 U3.4
  Top Layer w0.254: R15.2 R15.2@11.508,8.783
NetR16_2: R16.2 U3.5 | length 1
  Top Layer w0.152: U3.5 12.542,8.358 R16.2@12.542,7.583
  Top Layer w0.254: R16.2@12.542,7.583 R16.2
NetR17_2: R17.2 U1.7 | length 12.7
  Top Layer w0.152: U1.7 15.767,3.375 16.545,4.154 16.85,4.154 v1(16.897,4.201)
  Bottom Layer w0.152: v1(16.897,4.201) 16.918,4.222 17.139,4.222 17.988,5.071 23.854,5.071 25.225,3.7 25.475,3.7 R17.2
NetR18_2: R18.2 U1.9 | length 12.4
  Top Layer w0.152: U1.9 15.375,4.275 16.136,5.036 16.51,5.036 v1(16.558,5.083)
  Bottom Layer w0.152: v1(16.558,5.083) 16.625,5.083 16.788,5.246 17.215,5.246 17.93,5.961 18.469,6.5 R18.2
V_BAT: BT1.P C1.2 C8.2 J1.1 R1.2 R13.2 U3.10 | length 7.9
  Top Layer w0.152: R1.2 11.096,0.5 11.155,0.559 11.155,0.561 11.244,0.65 17.225,0.65 v1(17.45,0.875)
  Bottom Layer w0.152: v1(17.45,0.875) 17.45,2.105 J1.1@17.467,2.122
  Bottom Layer w0.254: J1.1@17.467,2.122 J1.1
  other v1: 17.817,3.487 18.292,3.487
pads on no net: U1.14 U1.15 U1.16 U1.17 U1.18

## Polygon pours and split planes (outlines as drawn)
GND on Top Layer "NONET_L-01_P-001" (solid, pour order 0): 0,9.513 cw(c2.987,9.513) 2.987,12.5 29.013,12.5 cw(c29.013,9.513) 32,9.513 32,2.987 cw(c29.013,2.987) 29.013,0 2.987,0 cw(c2.987,2.987) 0,2.987 0,8.2
GND on Bottom Layer "NONET_L-01_P-001" (solid, pour order 1): 0,9.513 cw(c2.987,9.513) 2.987,12.5 29.013,12.5 cw(c29.013,9.513) 32,9.513 32,2.987 cw(c29.013,2.987) 29.013,0 2.987,0 cw(c2.987,2.987) 0,2.987 0,8.2

## Other copper
Top Layer:
  rectangle net NetD1_2: 9.85,11.175 10.95,12.241
  rectangle net NetD1_2: 8.45,6.85 10.15,10.65
  rectangle net NetD1_2: 7.925,6.85 10.15,8.4
  rectangle net NetD1_2: 8.45,8.875 10.95,11.7
  rectangle net +3V_Out: 5.55,11.25 7.675,12.125
  rectangle net +3V_Out: 4.325,6.675 7.075,12.125
  rectangle net +3V_Out: 14.582,6.775 16.425,7.65